# Altium PCB RheoBoard_V1.PcbDoc (part 5 of 6)
Units mm, origin at the board's own origin, x right, y up, seen from the top; angles counter-clockwise.
Board outline 146 x 88.34 mm, 2 copper layers (Top Layer, Bottom Layer); 134 components, 71 nets, 344 pads, 145 vias.
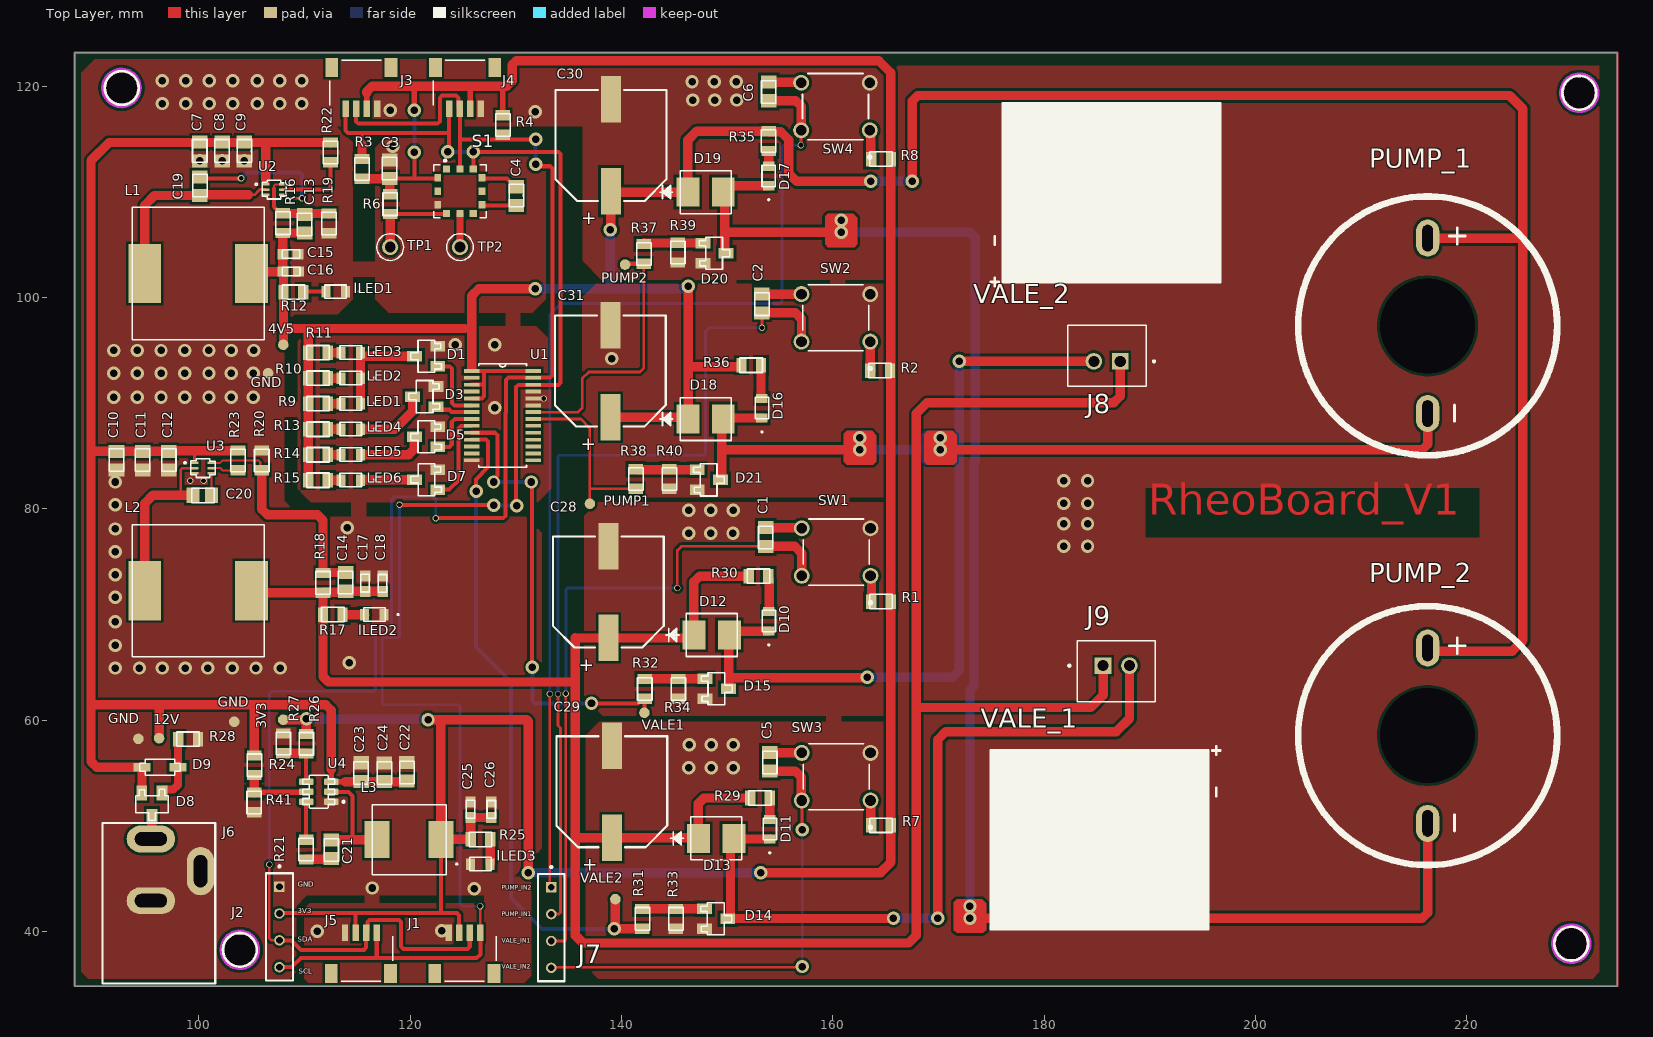
[diagram p0: Top Layer view]

## Via types
v1: diameter 1.27, hole 0.711, Top Layer to Bottom Layer, tented both sides, 130 vias
v2: diameter 0.6, hole 0.45, Top Layer to Bottom Layer, tented both sides, 13 vias
v3: diameter 0.65, hole 0.4, Top Layer to Bottom Layer, tented both sides, 2 vias

## Nets (pads, with @x,y where several pads share a name; then routed paths per layer and width w, separated by ;. In a path a pad name is that pad's centre, name@x,y a point inside that pad or via, vN(x,y) a via of type N, cw(c..) or ccw(c..) an arc to the next point about the centre after c; other vN are vias at no path point) (continued)
+12: (continued)
  Top Layer w0.254: U3.1@99.6,84.37 99.6,85.27
  Top Layer w0.508: 112.54,55.35 112.535,55.345 U4.3@112.535,54.185 113.835,54.185 113.84,54.18
  Top Layer w0.889: D8.2@94.62,53.12 94.625,53.125 94.625,55.555 D9.1@94.63,55.56 90.34,55.56 89.8,56.1 89.8,61.468 ; 12V.1@96.241,58.293 96.241,61.443 96.266,61.468 ; R23.2@103.71,85.52 97.236,85.52 C12.2@97.165,85.449 C11.2@94.688,85.449 C10.2@92.212,85.449 90.061,85.449 89.8,85.71 ; R24.2@105.26,56.68 105.26,61.329 ; 106.33,111.17 106.33,114.674 ; R22.2@112.46,114.67 112.456,114.674 106.33,114.674 ; 112.54,55.35 112.54,60.947 112.019,61.468 96.266,61.468 ; 113.84,54.18 119.628,54.18 C22.2@119.699,54.251 ; 89.8,61.468 96.266,61.468 ; 89.8,61.468 89.8,85.71 ; 89.8,85.71 89.8,112.96 91.519,114.679 103.57,114.679 103.574,114.674 106.33,114.674